# Altium PCB EEM_FMC_Carrier.PcbDoc (part 6 of 19)
Units mm, origin at the board's own origin, x right, y up, seen from the top; angles counter-clockwise.
Board outline 222.9 x 100 mm, 6 copper layers (TopLayer, MidLayer1, MidLayer2, SignalLayer1, Internal Plane 1, BottomLayer), stack 1.528 mm thick; 790 components, 743 nets, 3570 pads, 2277 vias.
Unrouted connection lines stored in the file: 3.
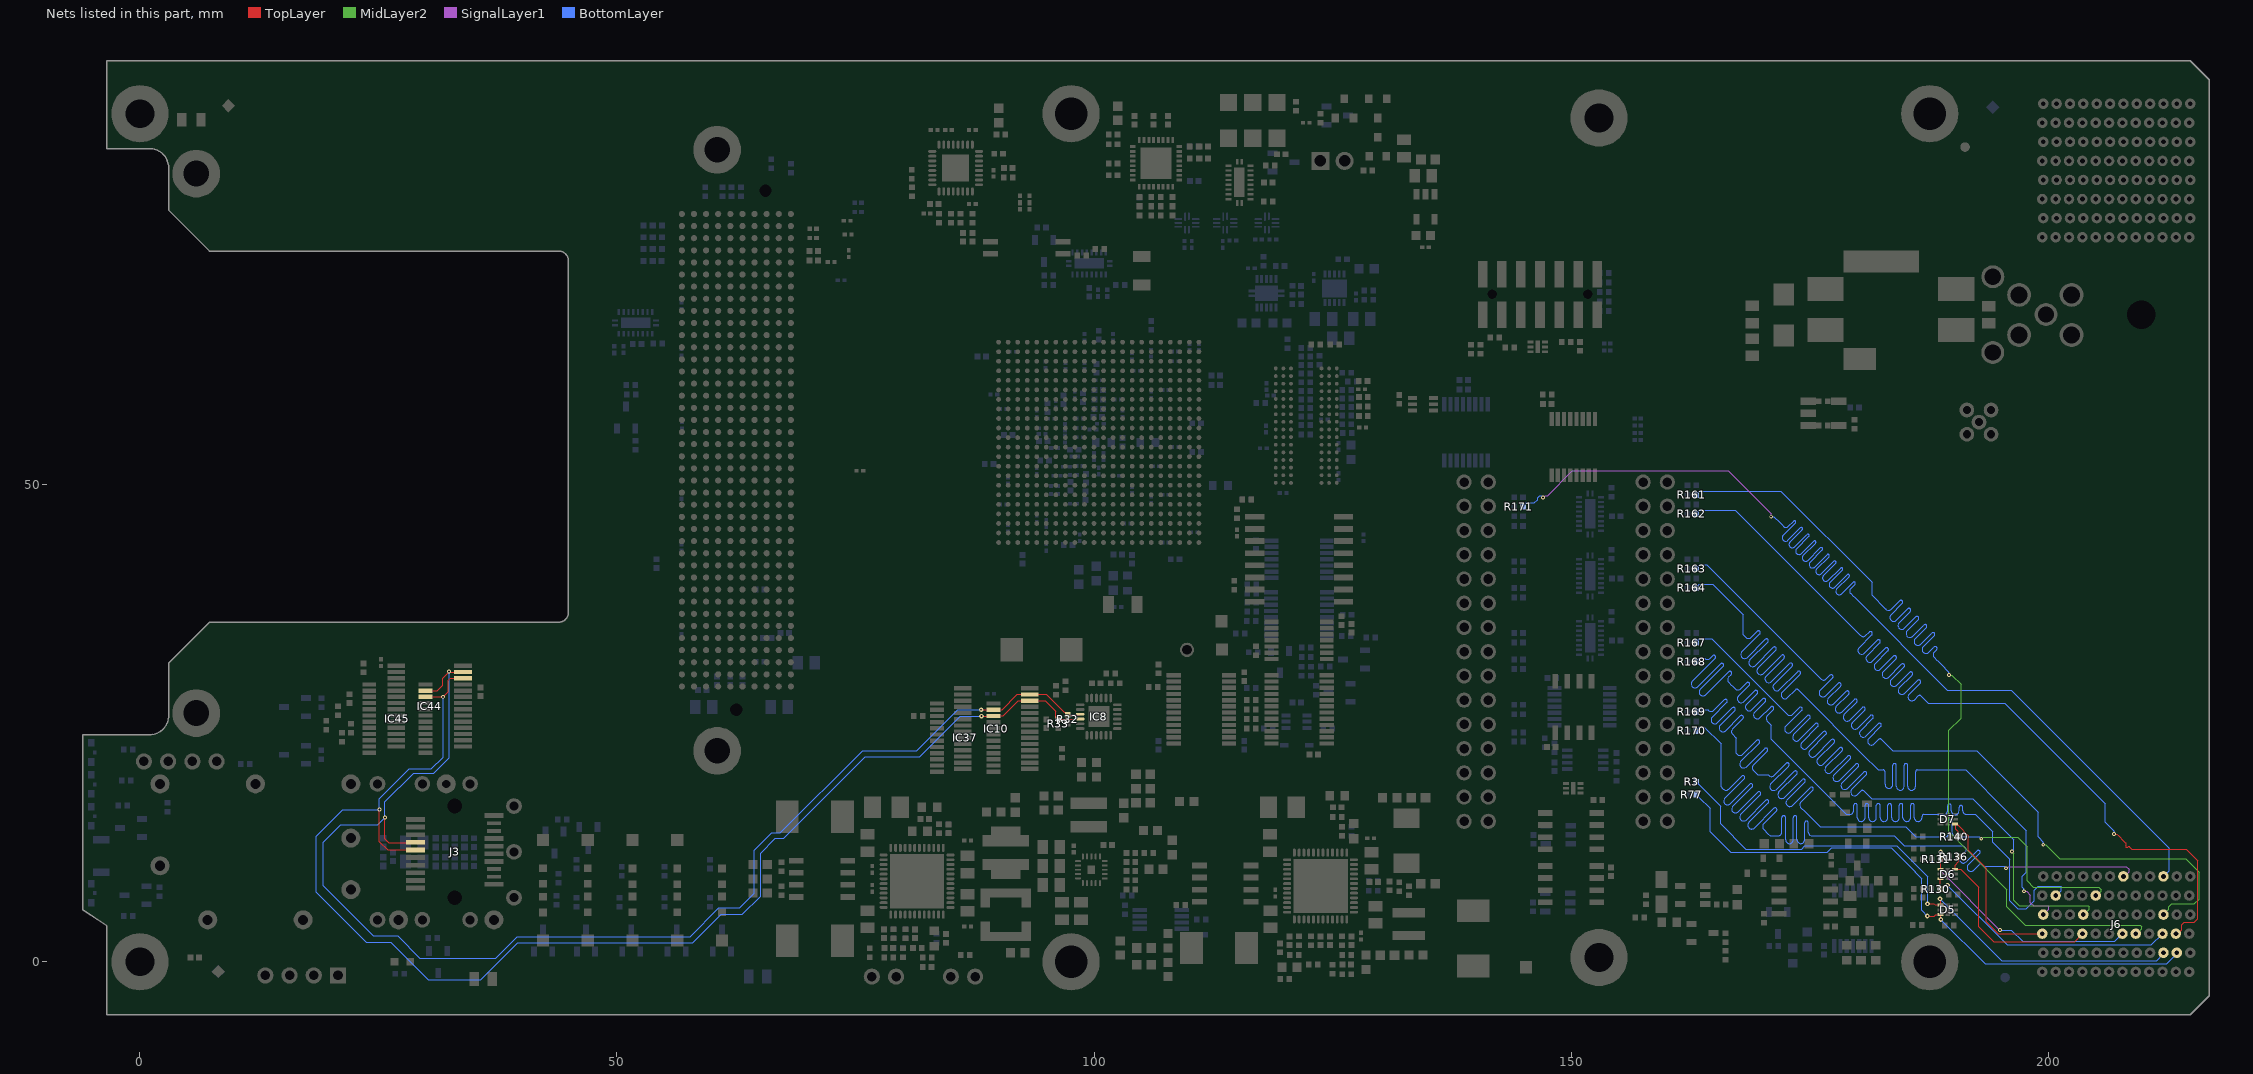
[diagram p8: the nets of this part, all layers, seen from the top]

## Part data (continued)
R66 R189 R201 R203 R210 R214 R219 R290: library part R0402_5K1_1%_0.0625W_100PPM, "Resistor - 1%", Case=0402, Manufacturer=GENERIC, Manufacturer1 ComponentHeight=0.4mm, Manufacturer1 Example="YAGEO PHYCOMP", Manufacturer1 Part Number=232270675102L, Power=0.0625W, Tolerance=±1%, Author="CERN DEM JLC", Component Type=Standard, HelpURL=\\cern.ch\dfs\Applications\Altium\Datasheets\R0402_Phycomp_RC0402.pdf, Manufacturer Part Number=R0402_5K1_1%_0.0625W_100PPM, Mounted=Yes, Part Description="General Purpose Thick Film Chip Resistor", Part Number=R0402_5K1_1%_0.0625W_100PPM, Pin Count=2, PressFit=No, Sense=No, SMD=Yes, Socket=No, Status="Not Recommended", TC=±100ppm/°C
  R66 R189 R201 R210 R290: CreateDate=03.12.2007, LatestRevisionDate=17.10.2012
  R203 R214 R219: CreateDate=2007-12-03, LatestRevisionDate=2012-10-17
R78: library part R0402_300R_1%_0.0625W_100PPM, "Resistor - 1%", Case=0402, Manufacturer=GENERIC, Manufacturer1 ComponentHeight=0.4mm, Manufacturer1 Example="YAGEO PHYCOMP", Manufacturer1 Part Number=232270673001L, Power=0.0625W, Tolerance=±1%, Author="CERN DEM JLC", Component Type=Standard, CreateDate=03.12.2007, HelpURL=\\cern.ch\dfs\Applications\Altium\Datasheets\R0402_Phycomp_RC0402.pdf, LatestRevisionDate=17.10.2012, Manufacturer Part Number=R0402_300R_1%_0.0625W_100PPM, Mounted=Yes, Part Description="General Purpose Thick Film Chip Resistor", Part Number=R0402_300R_1%_0.0625W_100PPM, Pin Count=2, PressFit=No, Sense=No, SMD=Yes, Socket=No, Status="Not Recommended", TC=±100ppm/°C
R88 R89 R90 R91 R130 R131 R132 R133 R134 R135 R136 R137 R138 R139 R140 R274: library part R0402_22R_1%_0.0625W_100PPM, "Resistor - 1%", Case=0402, Manufacturer=GENERIC, Manufacturer1 ComponentHeight=0.4mm, Manufacturer1 Example="YAGEO PHYCOMP", Manufacturer1 Part Number=232270672209L, Power=0.0625W, Tolerance=±1%, Author="CERN DEM JLC", Component Type=Standard, HelpURL=\\cern.ch\dfs\Applications\Altium\Datasheets\R0402_Phycomp_RC0402.pdf, Manufacturer Part Number=R0402_22R_1%_0.0625W_100PPM, Mounted=Yes, Part Description="General Purpose Thick Film Chip Resistor", Part Number=R0402_22R_1%_0.0625W_100PPM, Pin Count=2, PressFit=No, Sense=No, SMD=Yes, Socket=No, Status="Not Recommended"
  R88 R89 R90 R91: CreateDate=03-Dec-07, LatestRevisionDate=17-Oct-12, TC=±100ppm/°C
  R130 R131 R132 R133 R134 R135 R136 R137 R138 R139 R140: CreateDate=03.12.2007, LatestRevisionDate=17.10.2012
  R274: CreateDate=03.12.2007, LatestRevisionDate=17.10.2012, TC=±100ppm/°C
R101: library part R0402_200K_1%_0.0625W_100PPM, "Resistor - 1%", Case=0402, Manufacturer=GENERIC, Manufacturer1 ComponentHeight=0.4mm, Manufacturer1 Example="YAGEO PHYCOMP", Manufacturer1 Part Number=232270672004L, Power=0.0625W, Tolerance=±1%, Author="CERN DEM JLC", Component Type=Standard, CreateDate=03.12.2007, HelpURL=\\cern.ch\dfs\Applications\Altium\Datasheets\R0402_Phycomp_RC0402.pdf, LatestRevisionDate=17.10.2012, Manufacturer Part Number=R0402_200K_1%_0.0625W_100PPM, Mounted=Yes, Part Description="General Purpose Thick Film Chip Resistor", Part Number=R0402_200K_1%_0.0625W_100PPM, Pin Count=2, PressFit=No, Sense=No, SMD=Yes, Socket=No, Status="Not Recommended", TC=±100ppm/°C
R119 R120: library part "R0805_10M_1%_0.125W_100PPM_VISHAY_CRCW e3", "Resistor - 1%", Case=0805, Manufacturer="VISHAY DALE", Manufacturer Part Number=CRCW080510M0FKEA, Power=0.125W, Tolerance=±1%, Author="CERN DEM BC", Component Type=Standard, ComponentHeight=0.5mm, CreateDate=2019-11-12, HelpURL="\\cern.ch\dfs\Applications\Altium\Datasheets\R0805_VISHAY_CRCW e3.pdf", LatestRevisionDate=2019-11-12, Mounted=Yes, Part Description="150V, Standard Thick Film Chip Resistor", Part Number="R0805_10M_1%_0.125W_100PPM_VISHAY_CRCW e3", Pin Count=2, PressFit=No, Sense=No, SMD=Yes, Socket=No, Status=None, TC=±100ppm/°C
R124 R242 R269: library part R0402_100K_1%_0.0625W_100PPM, "Resistor - 1%", Case=0402, Manufacturer=GENERIC, Manufacturer1 ComponentHeight=0.4mm, Manufacturer1 Example="YAGEO PHYCOMP", Manufacturer1 Part Number=232270671004L, Power=0.0625W, Tolerance=±1%, Author="CERN DEM JLC", Component Type=Standard, HelpURL=\\cern.ch\dfs\Applications\Altium\Datasheets\R0402_Phycomp_RC0402.pdf, Manufacturer Part Number=R0402_100K_1%_0.0625W_100PPM, Mounted=Yes, Part Description="General Purpose Thick Film Chip Resistor", Part Number=R0402_100K_1%_0.0625W_100PPM, Pin Count=2, PressFit=No, Sense=No, SMD=Yes, Socket=No, Status="Not Recommended", TC=±100ppm/°C
  R124 R269: CreateDate=03.12.2007, LatestRevisionDate=17.10.2012
  R242: CreateDate=2007-12-03, LatestRevisionDate=2012-10-17
R125 R197 R199 R257 R260 R262 R267 R268 R277 R279 R280 R281 R282: library part R0603_10K_1%_0.1W_100PPM, "Resistor - 1%", Case=0603, Manufacturer=GENERIC, Manufacturer1 ComponentHeight=0.55mm, Manufacturer1 Example="NIC COMPONENT", Manufacturer1 Part Number=NRC06F1002TRF, Power=0.1W, Tolerance=±1%, Author="CERN DEM JLC", Component Type=Standard, CreateDate=03.12.2007, HelpURL=\\cern.ch\dfs\Applications\Altium\Datasheets\R0603_NIC_NRC.pdf, LatestRevisionDate=13.03.2008, Manufacturer Part Number=R0603_10K_1%_0.1W_100PPM, Mounted=Yes, Part Description="General Purpose Thick Film Chip Resistor", Part Number=R0603_10K_1%_0.1W_100PPM, Pin Count=2, PressFit=No, Sense=No, SMD=Yes, Socket=No, Status=Preferred, TC=±100ppm/°C
R126: library part R0805_1M1_1%_0.125W_100PPM, "Resistor - 1%", Case=0805, Manufacturer=GENERIC, Manufacturer1 ComponentHeight=0.6mm, Manufacturer1 Example="NIC COMPONENT", Manufacturer1 Part Number=NRC10F1104TRF, Author="CERN DEM JLC", Component Type=Standard, CreateDate=03/12/2007, HelpURL=\\cern.ch\dfs\Applications\Altium\Datasheets\R0805_NIC_NRC.pdf, LatestRevisionDate=13/03/2008, Manufacturer Part Number=R0805_1M1_1%_0.125W_100PPM, Mounted=Yes, Part Description="General Purpose Thick Film Chip Resistor", Part Number=R0805_1M1_1%_0.125W_100PPM, Pin Count=2, PressFit=No, Sense=No, SMD=Yes, Socket=No, Status=Preferred
R184 R206 R208 R230 R259: library part R0402_7K5_1%_0.0625W_100PPM, "Resistor - 1%", Case=0402, Manufacturer=GENERIC, Manufacturer1 ComponentHeight=0.4mm, Manufacturer1 Example="YAGEO PHYCOMP", Manufacturer1 Part Number=232270677502L, Power=0.0625W, Tolerance=±1%, Author="CERN DEM JLC", Component Type=Standard, CreateDate=03.12.2007, HelpURL=\\cern.ch\dfs\Applications\Altium\Datasheets\R0402_Phycomp_RC0402.pdf, LatestRevisionDate=17.10.2012, Manufacturer Part Number=R0402_7K5_1%_0.0625W_100PPM, Mounted=Yes, Part Description="General Purpose Thick Film Chip Resistor", Part Number=R0402_7K5_1%_0.0625W_100PPM, Pin Count=2, PressFit=No, Sense=No, SMD=Yes, Socket=No, Status="Not Recommended", TC=±100ppm/°C
R185 R205 R209 R232: library part R0402_2K4_1%_0.0625W_100PPM, "Resistor - 1%", Case=0402, Manufacturer=GENERIC, Manufacturer1 ComponentHeight=0.4mm, Manufacturer1 Example="YAGEO PHYCOMP", Manufacturer1 Part Number=232270672402L, Power=0.0625W, Tolerance=±1%, Author="CERN DEM JLC", Component Type=Standard, HelpURL=\\cern.ch\dfs\Applications\Altium\Datasheets\R0402_Phycomp_RC0402.pdf, Manufacturer Part Number=R0402_2K4_1%_0.0625W_100PPM, Mounted=Yes, Part Description="General Purpose Thick Film Chip Resistor", Part Number=R0402_2K4_1%_0.0625W_100PPM, Pin Count=2, PressFit=No, Sense=No, SMD=Yes, Socket=No, Status="Not Recommended", TC=±100ppm/°C
  R185 R209 R232: CreateDate=03.12.2007, LatestRevisionDate=17.10.2012
  R205: CreateDate=2007-12-03, LatestRevisionDate=2012-10-17
R186 R200 R228: library part R0402_1K6_1%_0.0625W_100PPM, "Resistor - 1%", Case=0402, Manufacturer=GENERIC, Manufacturer1 ComponentHeight=0.4mm, Manufacturer1 Example="YAGEO PHYCOMP", Manufacturer1 Part Number=232270671602L, Power=0.0625W, Tolerance=±1%, Author="CERN DEM JLC", Component Type=Standard, HelpURL=\\cern.ch\dfs\Applications\Altium\Datasheets\R0402_Phycomp_RC0402.pdf, Manufacturer Part Number=R0402_1K6_1%_0.0625W_100PPM, Mounted=Yes, Part Description="General Purpose Thick Film Chip Resistor", Part Number=R0402_1K6_1%_0.0625W_100PPM, Pin Count=2, PressFit=No, Sense=No, SMD=Yes, Socket=No, Status="Not Recommended", TC=±100ppm/°C
  R186: CreateDate=03.12.2007, LatestRevisionDate=17.10.2012
  R200 R228: CreateDate=2007-12-03, LatestRevisionDate=2012-10-17
R190 R202: library part R0402_910R_1%_0.0625W_100PPM, "Resistor - 1%", Case=0402, Manufacturer=GENERIC, Manufacturer1 ComponentHeight=0.4mm, Manufacturer1 Example="YAGEO PHYCOMP", Manufacturer1 Part Number=232270679101L, Power=0.0625W, Tolerance=±1%, Author="CERN DEM JLC", Component Type=Standard, CreateDate=03.12.2007, HelpURL=\\cern.ch\dfs\Applications\Altium\Datasheets\R0402_Phycomp_RC0402.pdf, LatestRevisionDate=17.10.2012, Manufacturer Part Number=R0402_910R_1%_0.0625W_100PPM, Mounted=Yes, Part Description="General Purpose Thick Film Chip Resistor", Part Number=R0402_910R_1%_0.0625W_100PPM, Pin Count=2, PressFit=No, Sense=No, SMD=Yes, Socket=No, Status="Not Recommended", TC=±100ppm/°C
R192 R222 R223: library part R0402_22K_1%_0.0625W_100PPM, "Resistor - 1%", Case=0402, Manufacturer=GENERIC, Manufacturer1 ComponentHeight=0.4mm, Manufacturer1 Example="YAGEO PHYCOMP", Manufacturer1 Part Number=232270672203L, Power=0.0625W, Tolerance=±1%, Author="CERN DEM JLC", Component Type=Standard, CreateDate=03.12.2007, HelpURL=\\cern.ch\dfs\Applications\Altium\Datasheets\R0402_Phycomp_RC0402.pdf, LatestRevisionDate=17.10.2012, Manufacturer Part Number=R0402_22K_1%_0.0625W_100PPM, Mounted=Yes, Part Description="General Purpose Thick Film Chip Resistor", Part Number=R0402_22K_1%_0.0625W_100PPM, Pin Count=2, PressFit=No, Sense=No, SMD=Yes, Socket=No, Status="Not Recommended", TC=±100ppm/°C
R198: library part R0402_30K_1%_0.0625W_100PPM, "Resistor - 1%", Case=0402, Manufacturer=GENERIC, Manufacturer1 ComponentHeight=0.4mm, Manufacturer1 Example="YAGEO PHYCOMP", Manufacturer1 Part Number=232270673003L, Power=0.0625W, Tolerance=±1%, Author="CERN DEM JLC", Component Type=Standard, CreateDate=03.12.2007, HelpURL=\\cern.ch\dfs\Applications\Altium\Datasheets\R0402_Phycomp_RC0402.pdf, LatestRevisionDate=17.10.2012, Manufacturer Part Number=R0402_30K_1%_0.0625W_100PPM, Mounted=Yes, Part Description="General Purpose Thick Film Chip Resistor", Part Number=R0402_30K_1%_0.0625W_100PPM, Pin Count=2, PressFit=No, Sense=No, SMD=Yes, Socket=No, Status="Not Recommended", TC=±100ppm/°C
R204 R231: library part R0402_2K_1%_0.0625W_100PPM, "Resistor - 1%", Case=0402, Manufacturer=GENERIC, Manufacturer1 ComponentHeight=0.4mm, Manufacturer1 Example="YAGEO PHYCOMP", Manufacturer1 Part Number=232270672002L, Power=0.0625W, Tolerance=±1%, Author="CERN DEM JLC", Component Type=Standard, CreateDate=2007-12-03, HelpURL=\\cern.ch\dfs\Applications\Altium\Datasheets\R0402_Phycomp_RC0402.pdf, LatestRevisionDate=2012-10-17, Manufacturer Part Number=R0402_2K_1%_0.0625W_100PPM, Mounted=Yes, Part Description="General Purpose Thick Film Chip Resistor", Part Number=R0402_2K_1%_0.0625W_100PPM, Pin Count=2, PressFit=No, Sense=No, SMD=Yes, Socket=No, Status="Not Recommended", TC=±100ppm/°C
R211 R229 R261 R265: library part R0603_2K7_1%_0.1W_100PPM, "Resistor - 1%", Case=0603, Manufacturer=GENERIC, Manufacturer1 ComponentHeight=0.55mm, Manufacturer1 Example="YAGEO PHYCOMP", Manufacturer1 Part Number=RC0603FR-072K7L, Power=0.1W, Tolerance=±1%, Author="CERN DEM JLC", Component Type=Standard, HelpURL=\\cern.ch\dfs\Applications\Altium\Datasheets\R0603_PHYCOMP_RC0603.pdf, Manufacturer Part Number=R0603_2K7_1%_0.1W_100PPM, Mounted=Yes, Part Description="General Purpose Thick Film Chip Resistor", Part Number=R0603_2K7_1%_0.1W_100PPM, Pin Count=2, PressFit=No, Sense=No, SMD=Yes, Socket=No, Status=Preferred, TC=±100ppm/°C
  R211 R261 R265: CreateDate=02.05.2011, LatestRevisionDate=02.05.2011
  R229: CreateDate=2011-05-02, LatestRevisionDate=2011-05-02
R212 R241: library part "43k2 1% 0402", "Resistor - 1%", Case=0402, Manufacturer="MULTICOMP PRO", Manufacturer Part Number=MCMR04X4322FTL, Power=0.063W, Tolerance=±1%
R216 R220: library part R0402_3K6_1%_0.0625W_100PPM, "Resistor - 1%", Case=0402, Manufacturer=GENERIC, Manufacturer1 ComponentHeight=0.4mm, Manufacturer1 Example="YAGEO PHYCOMP", Manufacturer1 Part Number=232270673602L, Power=0.0625W, Tolerance=±1%, Author="CERN DEM JLC", Component Type=Standard, CreateDate=2007-12-03, HelpURL=\\cern.ch\dfs\Applications\Altium\Datasheets\R0402_Phycomp_RC0402.pdf, LatestRevisionDate=2012-10-17, Manufacturer Part Number=R0402_3K6_1%_0.0625W_100PPM, Mounted=Yes, Part Description="General Purpose Thick Film Chip Resistor", Part Number=R0402_3K6_1%_0.0625W_100PPM, Pin Count=2, PressFit=No, Sense=No, SMD=Yes, Socket=No, Status="Not Recommended", TC=±100ppm/°C
R217: library part R0402_75K_1%_0.0625W_100PPM, "Resistor - 1%", Case=0402, Manufacturer=GENERIC, Manufacturer1 ComponentHeight=0.4mm, Manufacturer1 Example="YAGEO PHYCOMP", Manufacturer1 Part Number=232270677503L, Power=0.0625W, Tolerance=±1%, Author="CERN DEM JLC", Component Type=Standard, CreateDate=2007-12-03, HelpURL=\\cern.ch\dfs\Applications\Altium\Datasheets\R0402_Phycomp_RC0402.pdf, LatestRevisionDate=2012-10-17, Manufacturer Part Number=R0402_75K_1%_0.0625W_100PPM, Mounted=Yes, Part Description="General Purpose Thick Film Chip Resistor", Part Number=R0402_75K_1%_0.0625W_100PPM, Pin Count=2, PressFit=No, Sense=No, SMD=Yes, Socket=No, Status="Not Recommended", TC=±100ppm/°C
R218 R258: library part R0402_9K1_1%_0.0625W_100PPM, "Resistor - 1%", Case=0402, Manufacturer=GENERIC, Manufacturer1 ComponentHeight=0.4mm, Manufacturer1 Example="YAGEO PHYCOMP", Manufacturer1 Part Number=232270679102L, Power=0.0625W, Tolerance=±1%, Author="CERN DEM JLC", Component Type=Standard, CreateDate=2007-12-03, HelpURL=\\cern.ch\dfs\Applications\Altium\Datasheets\R0402_Phycomp_RC0402.pdf, LatestRevisionDate=2012-10-17, Manufacturer Part Number=R0402_9K1_1%_0.0625W_100PPM, Mounted=Yes, Part Description="General Purpose Thick Film Chip Resistor", Part Number=R0402_9K1_1%_0.0625W_100PPM, Pin Count=2, PressFit=No, Sense=No, SMD=Yes, Socket=No, Status="Not Recommended", TC=±100ppm/°C
R234: library part R0402_3K_1%_0.0625W_100PPM, "Resistor - 1%", Case=0402, Manufacturer=GENERIC, Manufacturer1 ComponentHeight=0.4mm, Manufacturer1 Example="YAGEO PHYCOMP", Manufacturer1 Part Number=232270673002L, Power=0.0625W, Tolerance=±1%, Author="CERN DEM JLC", Component Type=Standard, CreateDate=2007-12-03, HelpURL=\\cern.ch\dfs\Applications\Altium\Datasheets\R0402_Phycomp_RC0402.pdf, LatestRevisionDate=2012-10-17, Manufacturer Part Number=R0402_3K_1%_0.0625W_100PPM, Mounted=Yes, Part Description="General Purpose Thick Film Chip Resistor", Part Number=R0402_3K_1%_0.0625W_100PPM, Pin Count=2, PressFit=No, Sense=No, SMD=Yes, Socket=No, Status="Not Recommended", TC=±100ppm/°C
R239: library part R0603_35K7_0.1%_0.063W_10PPM, "Resistor - 0.1%", Case=0603, Manufacturer=GENERIC, Manufacturer1 ComponentHeight=0.5mm, Manufacturer1 Example="TYCO HOLSWORTHY", Manufacturer1 Part Number=RN73C1J35K7BTDF, Power=0.063W, Tolerance=±0.1%, Author="CERN DEM JLC", Component Type=Standard, CreateDate=2007-12-03, HelpURL=\\cern.ch\dfs\Applications\Altium\Datasheets\R0603_Tyco_RN73.pdf, LatestRevisionDate=2008-03-13, Manufacturer Part Number=R0603_35K7_0.1%_0.063W_10PPM, Mounted=Yes, Part Description="Thin Film Chip Resistor", Part Number=R0603_35K7_0.1%_0.063W_10PPM, Pin Count=2, PressFit=No, Sense=No, SMD=Yes, Socket=No, Status="Not Recommended", TC=±10ppm
R240: library part R0603_28K7_0.1%_0.063W_10PPM, "Resistor - 0.1%", Case=0603, Manufacturer=GENERIC, Manufacturer1 ComponentHeight=0.5mm, Manufacturer1 Example="TYCO HOLSWORTHY", Manufacturer1 Part Number=RN73C1J28K7BTDF, Power=0.063W, Tolerance=±0.1%, Author="CERN DEM JLC", Component Type=Standard, CreateDate=2007-12-03, HelpURL=\\cern.ch\dfs\Applications\Altium\Datasheets\R0603_Tyco_RN73.pdf, LatestRevisionDate=2008-03-13, Manufacturer Part Number=R0603_28K7_0.1%_0.063W_10PPM, Mounted=Yes, Part Description="Thin Film Chip Resistor", Part Number=R0603_28K7_0.1%_0.063W_10PPM, Pin Count=2, PressFit=No, Sense=No, SMD=Yes, Socket=No, Status="Not Recommended", TC=±10ppm
R243 R244: library part R0402_300K_1%_0.0625W_100PPM, "Resistor - 1%", Case=0402, Manufacturer=GENERIC, Manufacturer1 ComponentHeight=0.4mm, Manufacturer1 Example="YAGEO PHYCOMP", Manufacturer1 Part Number=232270673004L, Power=0.0625W, Tolerance=±1%, Author="CERN DEM JLC", Component Type=Standard, CreateDate=2007-12-03, HelpURL=\\cern.ch\dfs\Applications\Altium\Datasheets\R0402_Phycomp_RC0402.pdf, LatestRevisionDate=2012-10-17, Manufacturer Part Number=R0402_300K_1%_0.0625W_100PPM, Mounted=Yes, Part Description="General Purpose Thick Film Chip Resistor", Part Number=R0402_300K_1%_0.0625W_100PPM, Pin Count=2, PressFit=No, Sense=No, SMD=Yes, Socket=No, Status="Not Recommended", TC=±100ppm/°C
R289: library part R0402_330K_1%_0.0625W_100PPM, "Resistor - 1%", Case=0402, Manufacturer=GENERIC, Manufacturer1 ComponentHeight=0.4mm, Manufacturer1 Example="YAGEO PHYCOMP", Manufacturer1 Part Number=232270673304L, Power=0.0625W, Tolerance=±1%, Author="CERN DEM JLC", Component Type=Standard, CreateDate=03.12.2007, HelpURL=\\cern.ch\dfs\Applications\Altium\Datasheets\R0402_Phycomp_RC0402.pdf, LatestRevisionDate=17.10.2012, Manufacturer Part Number=R0402_330K_1%_0.0625W_100PPM, Mounted=Yes, Part Description="General Purpose Thick Film Chip Resistor", Part Number=R0402_330K_1%_0.0625W_100PPM, Pin Count=2, PressFit=No, Sense=No, SMD=Yes, Socket=No, Status="Not Recommended", TC=±100ppm/°C
SW1: library part SW_TYCO_1571983-1, "2 Ways SPST DIP Switch", Manufacturer=TYCO, Manufacturer Part Number="1571983-1 or GDH02S04", Author="CERN DEM JLC", Component Type=Standard, ComponentHeight=2.31mm, CreateDate=08.01.2009, Family=Switch, HelpURL=\\cern.ch\dfs\Applications\Altium\Datasheets\SW_TYCO_1571983-1.pdf, LatestRevisionDate=08.01.2009, Mounted=Yes, PackageDescription="Pitch 1.27mm,  Body3.66x6.2mm, 2 Ways SPST Surface-Mount DIP Switch, TYCO GDH Series", Part Description="2 Way SPST SMD DIP Switch, Latched, Contact Rating 0.025A 24VDC", Part Number=SW_TYCO_1571983-1, Pin Count=4, PressFit=No, Sense=No, SMD=Yes, Socket=No, Status=None
SW2: library part SW_OMRON_B3U-3000PM, "1 Ways SPST DIP Switch", Manufacturer=OMRON, Manufacturer Part Number=B3U-3000PM, Author="CERN DEM HF", Component Type=Standard, ComponentHeight=1.35mm, CreateDate=2022-10-04, Family=Switch, HelpURL=\\cern.ch\dfs\Applications\Altium\Datasheets\SW_OMRON_B3U.pdf, LatestRevisionDate=2022-10-04, Mounted=Yes, PackageDescription="Body 3.2x4.0mm, SPST Surface-Mounting Tactile Switch with Side Actuator (B3U Series)", Part Description="Ultra-small Surface-mounting Tactile Switche with High Contact Reliability, Side-actuated, Contact Rating 50mA 12VDC", Part Number=SW_OMRON_B3U-3000PM, Pin Count=2, PressFit=No, Sense=Yes, Sense Comment=Non-washable, SMD=Yes, Socket=No, Status=None
T1: library part CMP-013-00664-1, "Trans MOSFET P-CH 50V 0.18A Automotive 3-Pin SOT-23 T/R", Case/Package=TO-236-3, Max Operating Temperature=150°C, Min Operating Temperature=-55°C, Mounting Technology="Surface Mount"
T2 T3 T4 T5 T6 T8 T10 T11 T12 T13 T14 T16 T17 T18 T19 T20 T21 T22 T23: library part IRFML8244TRPBF, "N-CHANNEL MOSFET WITH DIODE", Case=SOT23-3, Manufacturer="INTERNATIONAL RECTIFIER", Manufacturer Part Number=IRFML8244TR, Author="CERN DEM JMW", Bonding=No, Component Type=Standard, ComponentHeight=1.12mm, CreateDate=07.08.2015, Device=IRFML8244TRPbF, HelpURL=\\cern.ch\dfs\Applications\Altium\Datasheets\IRFML8244TRPbF.pdf, LatestRevisionDate=02.06.2022, Mounted=Yes, PackageDescription="SOT23, 0.95mm Pitch; 3 Pin, 1.30mm W X 2.92mm L X 1.12mm H body, IPC Medium Density", Part Description="25V 5.8A N-Channel HEXFET® Power MOSFET", Part Number=IRFML8244TRPBF, Pin Count=3, PressFit=No, Sense=No, SMD=Yes, Socket=No
T7 T9: "20V DUAL N-Channel 2.5V Specified PowerTrench MOSFET", Case=SOIC8, Manufacturer="FAIRCHILD SEMICONDUCTOR", Author="CERN DEM BC", Bonding=No, Component Type=Standard, ComponentHeight=1.75mm, CreateDate=2015-09-02, Device=FDS9926A, HelpURL=\\cern.ch\dfs\Applications\Altium\Datasheets\FDS9926A.pdf, LatestRevisionDate=2015-09-02, Manufacturer Part Number=FDS9926A, Mounted=Yes, PackageDescription="SOIC 8, Pitch 1.27mm - Body 4x5mm, IPC Medium Density", Part Description="20V DUAL N-Channel 2.5V Specified PowerTrench® MOSFET", Part Number=FDS9926A, Pin Count=8, PressFit=No, Sense=No, SMD=Yes, Socket=No
T15 T24 T25 T26: "N-CHANNEL MOSFET WITH DIODE", Case=SOT23-3, Manufacturer="ON SEMICONDUCTOR", Manufacturer Part Number=BSS138L, Author="CERN DEM JLC", Bonding=No, Component Type=Standard, ComponentHeight=1.11mm, CreateDate=23.03.2009, Device=BSS138LT1G, HelpURL=\\cern.ch\dfs\Applications\Altium\Datasheets\BSS138LT1G.pdf, LatestRevisionDate=25.05.2022, Mounted=Yes, PackageDescription="SOT23, 0.95mm Pitch; 3 Pin, 1.40mm W X 3.00mm L X 1.10mm H body, IPC Medium Density", Part Description="50V, 200mA N-Channel Enhancement Mode Field-Effect Transistor", Part Number=BSS138LT1G, Pin Count=3, PressFit=No, Sense=No, SMD=Yes, Socket=No
TP1 TP2 TP3 TP4 TP5 TP6 TP7 TP8 TP9 TP10: library part SMD_PAD_1.27X1.27MM, "Test Point", Author="CERN DEM JLC", Component Type="Standard (No BOM)", ComponentHeight=0mm, CreateDate=12.01.2008, Family="Test Point", HelpURL=Undefined, LatestRevisionDate=12.01.2008, Mounted=No, PackageDescription="1.27mm x 1.27mm PCB Copper Area (SMD Test Point)", Part Description="1.27mm x 1.27mm PCB Copper Area (SMD Test Point)", Part Number=SMD_PAD_1.27X1.27MM, Pin Count=1, Sense=No, SMD=Yes, Socket=No, Status=None
TR1: library part XFMR_MINI-CIRCUITS_TC2-72T+, "50 Ohms 10 to 700 MHzz RF Transformer", Manufacturer=MINI-CIRCUITS, Manufacturer Part Number=TC2-72T+, Author=GK, Component Type=Standard, ComponentHeight=4.06mm, CreateDate=18.10.2019, HelpURL=\\cern.ch\dfs\Applications\Altium\Datasheets\XFMR_MINI-CIRCUITS_TC2-1TX+.pdf, LatestRevisionDate=18.10.2019, Mounted=Yes, Part Description="50 Ohms 10 to 700MHz RF Transformer", Part Number=XFMR_MINI-CIRCUITS_TC2-72T+, Pin Count=5, Sense=No, SMD=Yes, Socket=No, Status=None
W1 W2: library part SAMTEC_MTLW-102-07-L-S-250, "2 Mini Wire-Wrap Contact Strip Header", Manufacturer=SAMTEC, Manufacturer Part Number=MTLW-102-07-L-S-250, Author="CERN DEM JLC", Component Type=Standard, ComponentHeight=7.87mm, CreateDate=2012-12-13, Family="Header 2", HelpURL=\\cern.ch\dfs\Applications\Altium\Datasheets\SAMTEC_MTLW-102-07-L-S-250.pdf, LatestRevisionDate=2012-12-13, Mounted=Yes, Part Description="2 Contacts, Pitch 2.54mm, Single Row Through Mount Straight Header (Post Lead = 6.35mm, Tail Lead 3.05mm, Insulator 1.52mm)", Part Number=SAMTEC_MTLW-102-07-L-S-250, Pin Count=2, PressFit=No, Sense=No, SMD=No, Socket=No, Status=None
W3: library part SAMTEC_HTSW-104-23-L-S, "4 Mini Wire-Wrap Contact Strip Header", Manufacturer=SAMTEC, Manufacturer Part Number=HTSW-104-23-L-S, Author="CERN DEM JLC", Component Type=Standard, ComponentHeight=8.38mm, CreateDate=22/02/2018, Family="Header 4", HelpURL=\\cern.ch\dfs\Applications\Altium\Datasheets\SAMTEC_HTSW-104-23-L-S.pdf, LatestRevisionDate=22/02/2018, Mounted=Yes, Part Description="4 Contacts, Pitch 2.54mm, Single Row  Through Mount Straight Header (Post Lead 5.84mm, Tail Lead 2.92mm, Insulator 2.54mm)", Part Number=SAMTEC_HTSW-104-23-L-S, Pin Count=4, PressFit=No, Sense=No, SMD=No, Socket=No, Status=Preferred, Status Comment="High Temperature"

## Via types
v1: diameter 0.4, hole 0.2, TopLayer to BottomLayer, tented both sides, 1032 vias
v2: diameter 0.5, hole 0.2, TopLayer to BottomLayer, tented both sides, 979 vias
v3: diameter 0.5, hole 0.2, TopLayer to BottomLayer, 162 vias
v4: diameter 0.8, hole 0.5, TopLayer to BottomLayer, tented both sides, 102 vias
v5: diameter 0.6, hole 0.3, TopLayer to BottomLayer, tented both sides, 2 vias

## Nets (pads, with @x,y where several pads share a name; then routed paths per layer and width w, separated by ;. In a path a pad name is that pad's centre, name@x,y a point inside that pad or via, vN(x,y) a via of type N, cw(c..) or ccw(c..) an arc to the next point about the centre after c; other vN are vias at no path point)
BGA0: D6.3 J6.C3 R130.2 | length 27.6
  TopLayer w0.114: D6.3@188.675,8.637 D6.3@188.738,8.7 188.72,8.682 188.72,8.637 188.72,7.9 R130.2@188.72,7.725 ; R130.2@188.72,7.625 188.72,7.64 188.953,7.873 189.193,7.873 189.346,8.025 v2(189.45,8.025)
  BottomLayer w0.114: v2(189.45,8.025) 195.7,1.775 210.825,1.775 J6.C3@212,2.95
BGA1: D6.1 J6.F3 R131.2 | length 26.3
  TopLayer w0.114: D6.1@188.738,9.7 188.75,9.712 v2(188.75,11.525)
  SignalLayer1 w0.114: v2(188.75,11.525) 188.75,9.525 v1(194.95,3.325)
  BottomLayer w0.114: v1(194.95,3.325) 196.168,3.325 197.35,2.143 206.993,2.143 J6.F3@207.8,2.95
BGA2: D6.6 J6.I3 R136.2 | length 20.8
  TopLayer w0.114: R136.2@190.582,11.03 190.661,10.951 190.661,10.528 190.258,10.125 D6.6@190.258,9.7 190.875,9.7 192.748,7.827 192.748,3.7 194.323,2.125 202.775,2.125 J6.I3@203.6,2.95
BGA3: D7.4 J6.L3 R140.2 | length 19.5
  TopLayer w0.114: D7.4@190.35,14.444 190.429,14.444 190.516,14.357 190.516,14.347 191.625,13.239 191.625,11.7 193.525,9.8 193.525,4.198 194.773,2.95 J6.L3@199.4,2.95 ; D7.4@190.35,14.475 190.35,13.9 190.615,13.635 R140.2@190.615,13.134
Board_I2C.SCL: IC8.4 IC10.12 IC37.22 IC44.12 IC45.22 J3.5 R33.1 | length 142.4
  TopLayer w0.125: IC10.12@93.248,27.375 94.898,27.375 96.001,26.273 96.001,25.647 96.228,25.42 R33.1@96.248,25.42 96.278,25.45 IC8.4@98.548,25.45
  TopLayer w0.127: v1(25.1,15.95) 25.1,12.575 25.95,11.725 J3.5@28.938,11.725 ; IC45.22@29.925,27.775 v1(31.775,27.775) 32.325,28.325 32.325,29.525 32.525,29.725 IC44.12@33.853,29.725 ; v2(88.2,25.75) 89.425,25.75 IC37.22@89.45,25.775 90.475,25.775 92.075,27.375 IC10.12@93.248,27.375
  BottomLayer w0.127: v1(31.775,27.775) 31.775,21.45 30.55,20.225 28.225,20.225 25.1,17.1 v1(25.1,15.95) 21.275,15.95 18.5,13.175 18.5,7.275 23.725,2.05 26.275,2.05 30.225,-1.9 35.7,-1.9 39.575,1.975 57.95,1.975 60.95,4.975 63.13,4.975 65.05,6.895 65.05,11.395 66.605,12.95 67.5,12.95 76.025,21.475 81.725,21.475 86,25.75 v2(88.2,25.75)
Board_I2C.SDA: IC8.3 IC10.13 IC37.23 IC44.13 IC45.23 J3.4 R32.1 | length 139.7
  TopLayer w0.125: v2(88.175,26.425) IC37.23@89.45,26.425 90.375,26.425 91.975,28.025 IC10.13@93.248,28.025 94.975,28.025 96.856,26.144 97.024,26.144 R32.1@97.248,25.92 98.518,25.92 IC8.3@98.548,25.95
  TopLayer w0.127: v1(25.675,15.125) 25.675,12.925 26.1,12.5 28.875,12.5 J3.4@28.9,12.525 ; IC45.23@29.925,28.425 31.175,28.425 31.725,28.975 31.725,29.725 v1@32.375,30.375 ; v1(32.4,30.425) 32.45,30.375 IC44.13@33.853,30.375
  BottomLayer w0.125: v1(25.675,15.125) 24.9,14.35 21.025,14.35 19.225,12.55 19.225,7.95 24.45,2.725 27,2.725 29.35,0.375 37.275,0.375 39.55,2.65 57.67,2.65 60.67,5.65 62.85,5.65 64.375,7.175 64.375,11.675 66.215,13.515 67.11,13.515 75.745,22.15 81.445,22.15 85.72,26.425 v2(88.175,26.425)
  BottomLayer w0.127: v1(25.675,15.125) 25.675,16.775 28.687,19.787 30.813,19.787 32.4,21.375 v1(32.4,30.425)
BP_I2C.SCL: D5.3 J6.B2 R77.1 | length 62.5
  TopLayer w0.114: v2(187.348,4.8) 188.075,4.8 188.225,4.95 188.8,4.95 188.761,4.911 v2(188.761,4.433)
  BottomLayer w0.114: R77.1@163.15,17.526 163.15,17.506 163.383,17.273 163.403,17.273 164.6,16.076 164.6,13.65 166.754,11.496 176.871,11.496 177.325,11.95 183.551,11.95 186.059,9.442 186.059,9.406 186.745,8.72 186.745,5.403 v2(187.348,4.8) ; v2(188.761,4.433) 193.419,-0.225 196.15,-0.225 198.375,-0.225 212.425,-0.225 213.5,0.85 J6.B2@213.5,0.95
BP_I2C.SDA: D5.1 J6.C2 R3.1 | length 61.2
  TopLayer w0.114: v2(187.373,6.075) 187.398,6.1 188.025,6.1 188.168,5.957 D5.1@188.738,5.957 ; v2(188.675,6.6) 188.738,6.537 D5.1@188.738,5.95
  BottomLayer w0.114: R3.1@163.15,18.872 163.15,18.852 163.383,18.619 163.403,18.619 165.7,16.322 165.7,14.448 168.323,11.825 171.601,11.825 174.175,11.825 174.525,12.175 184.125,12.175 187.373,8.927 v2(187.373,6.075) ; v2(188.675,6.6) 195.156,0.119 196.3,0.119 196.65,0.119 211.394,0.119 212.1,0.825 J6.C2@212.1,0.95
BP_IO.LVDS_N0: J6.E3 R161.1 | length 101.1
  MidLayer2 w0.11: v1(189.623,30.075) 189.643,30.055 189.899,30.055 190.882,29.072 190.882,25.518 189.613,24.248 189.613,13.627 195.697,7.543 195.697,5.768 197.615,3.85 209.65,3.85 209.8,3.7 209.8,3.45 209.3,2.95 J6.E3@209.2,2.95
  BottomLayer w0.085: R161.1@163.15,48.95 163.397,49.197 163.397,49.294 163.447,49.344 171.994,49.344 181.563,39.775 181.563,38.409 182.9,37.072 182.963,37.01 182.974,36.998 183.005,36.967 ccw(c183.291,37.253) 183.577,36.967 184.446,37.835 cw(c184.582,37.699) 184.718,37.835 cw(c184.582,37.699) 184.718,37.563 ; 184.717,37.562 183.543,36.388 ccw(c183.829,36.102) 184.08,35.784 184.084,35.784 185.29,36.991 cw(c185.426,36.855) 185.562,36.991 cw(c185.426,36.855) 185.562,36.719 ; 185.562,36.718 184.387,35.543 ccw(c184.673,35.257) 184.924,34.94 184.928,34.94 186.134,36.147 cw(c186.27,36.011) 186.407,36.147 cw(c186.27,36.011) 186.407,35.874 ; 186.406,35.874 185.231,34.699 ccw(c185.517,34.413) 185.768,34.096 185.772,34.096 186.979,35.302 cw(c187.115,35.166) 187.251,35.302 cw(c187.115,35.166) 187.251,35.03 ; 187.25,35.03 186.075,33.855 ccw(c186.361,33.569) 186.613,33.252 186.616,33.252 187.823,34.458 cw(c187.959,34.322) 188.095,34.458 cw(c187.959,34.322) 188.095,34.186 ; 188.095,34.185 186.92,33.01 ccw(c187.206,32.724) 187.457,32.407 187.461,32.407 188.042,32.988 cw(c188.178,32.852) 188.314,32.988 cw(c188.178,32.852) 188.314,32.716 188.071,32.473 ccw(c188.357,32.187) 188.071,31.901 188.354,31.618 188.428,31.544 188.736,31.236 189.62,30.353 189.62,30.078 v1(189.623,30.075)
BP_IO.LVDS_N1: J6.B3 R162.1 | length 109.6
  TopLayer w0.085: v1(206.924,13.401) 206.927,13.397 207.201,13.397 207.356,13.243 ; 207.357,13.243 207.938,12.663 208.169,12.431 cw(c208.068,12.33) 208.169,12.229 208.168,12.228 ccw(c208.269,12.127) 208.168,12.027 ccw(c208.269,12.127) 208.369,12.027 208.371,12.028 cw(c208.471,11.927) 208.572,12.028 208.775,11.825 214.475,11.825 214.8,11.5 215.321,10.979 215.692,10.608 215.692,4.517 215.325,4.15 214.261,4.15 213.994,3.883 213.994,3.375 213.569,2.95 J6.B3@213.4,2.95
  BottomLayer w0.085: R162.1@163.15,46.95 163.391,47.191 163.391,47.294 163.441,47.344 167.206,47.344 180.238,34.313 180.343,34.208 ccw(c180.629,34.494) 180.915,34.208 181.262,34.555 cw(c181.398,34.419) 181.534,34.555 cw(c181.398,34.419) 181.534,34.283 ; 181.534,34.282 180.189,32.937 ccw(c180.475,32.651) 180.726,32.334 180.73,32.334 182.106,33.711 cw(c182.243,33.575) 182.379,33.711 cw(c182.243,33.575) 182.379,33.439 ; 182.378,33.438 181.033,32.093 ccw(c181.319,31.807) 181.57,31.49 181.574,31.49 182.951,32.866 cw(c183.087,32.73) 183.223,32.866 cw(c183.087,32.73) 183.223,32.594 181.877,31.249 ccw(c182.163,30.963) 182.414,30.646 182.418,30.646 183.795,32.022 cw(c183.931,31.886) 184.067,32.022 cw(c183.931,31.886) 184.067,31.75 ; 184.067,31.749 182.722,30.404 ccw(c183.008,30.118) 183.259,29.801 183.263,29.801 184.639,31.178 cw(c184.775,31.042) 184.911,31.178 cw(c184.775,31.042) 184.911,30.906 ; 184.911,30.905 183.566,29.56 ccw(c183.852,29.274) 184.103,28.957 184.107,28.957 185.484,30.334 cw(c185.62,30.198) 185.756,30.334 cw(c185.62,30.198) 185.756,30.061 ; 185.755,30.061 184.41,28.716 ccw(c184.696,28.43) 184.947,28.113 184.951,28.113 186.328,29.489 cw(c186.464,29.353) 186.6,29.489 cw(c186.464,29.353) 186.6,29.217 185.436,28.053 ccw(c185.722,27.767) 186.008,27.481 186.402,27.875 cw(c186.539,27.739) 186.675,27.875 ; 186.675,27.875 187.325,27.225 187.45,27.1 195.463,27.1 205.988,16.575 205.988,14.637 206.943,13.682 206.943,13.42 v1(206.924,13.401)
BP_IO.LVDS_N2: J6.C4 R163.1 | length 105.4
  MidLayer2 w0.11: v1(199.499,12.275) 199.518,12.256 199.775,12.256 201.231,10.8 214.455,10.8 215.85,9.405 215.85,6.578 215.334,6.062 212.962,6.062 212.663,5.763 212.663,5.513 J6.C4@212.1,4.95
  BottomLayer w0.085: R163.1@163.15,41.2 163.397,41.447 163.397,41.544 163.478,41.625 164.225,41.625 176.094,29.756 176.168,29.682 176.199,29.651 ccw(c176.485,29.937) 176.771,29.651 177.144,30.023 cw(c177.28,29.887) 177.416,30.023 cw(c177.28,29.887) 177.416,29.751 ; 177.416,29.75 176.124,28.459 ccw(c176.41,28.173) 176.124,27.887 ccw(c176.41,28.173) 176.661,27.856 176.665,27.856 177.988,29.179 cw(c178.124,29.043) 178.26,29.179 cw(c178.124,29.043) 178.26,28.907 ; 178.26,28.906 176.968,27.614 ccw(c177.254,27.328) 177.505,27.011 177.509,27.011 178.832,28.335 cw(c178.969,28.198) 179.105,28.335 cw(c178.969,28.198) 179.105,28.062 ; 179.104,28.062 177.813,26.77 ccw(c178.099,26.484) 177.813,26.198 ccw(c178.099,26.484) 178.35,26.167 178.354,26.167 179.677,27.49 cw(c179.813,27.354) 179.949,27.49 cw(c179.813,27.354) 179.949,27.218 ; 179.948,27.217 178.657,25.926 ccw(c178.943,25.64) 178.657,25.354 ccw(c178.943,25.64) 179.194,25.323 179.198,25.323 180.521,26.646 cw(c180.657,26.51) 180.793,26.646 cw(c180.657,26.51) 180.793,26.374 179.501,25.082 ccw(c179.787,24.796) 180.038,24.479 180.042,24.479 181.365,25.802 cw(c181.501,25.666) 181.638,25.802 cw(c181.501,25.666) 181.638,25.529 ; 181.637,25.529 180.345,24.237 ccw(c180.631,23.951) 180.345,23.665 ccw(c180.631,23.951) 180.883,23.634 180.886,23.634 182.21,24.957 cw(c182.346,24.821) 182.482,24.957 cw(c182.346,24.821) 182.482,24.685 ; 182.481,24.685 181.203,23.407 ccw(c181.489,23.121) 181.203,22.835 ccw(c181.489,23.121) 181.775,22.835 182.259,23.319 cw(c182.395,23.182) 182.532,23.318 183.218,22.632 183.292,22.558 183.737,22.113 192.537,22.113 197.45,17.2 198.95,15.7 198.95,13.098 199.495,12.553 199.495,12.279 v1(199.499,12.275)
BP_IO.LVDS_N3: J6.L4 R164.1 | length 107.4
  SignalLayer1 w0.11: v1(197.475,7.4) 197.495,7.38 197.751,7.38 198.163,6.969 198.163,6.177 198.481,5.858 199.974,5.858 200.081,5.75 200.081,5.5 199.532,4.95 J6.L4@199.5,4.95
  BottomLayer w0.085: R164.1@163.15,39.2 163.397,39.447 163.397,39.544 163.447,39.594 164.831,39.594 167,37.425 168.05,36.375 168.05,34.275 168.213,34.113 168.318,34.008 ccw(c168.604,34.294) 168.89,34.008 169.521,34.639 cw(c169.658,34.503) 169.794,34.639 cw(c169.658,34.503) 169.794,34.367 ; 169.793,34.367 167.91,32.484 ccw(c168.196,32.198) 168.448,31.881 168.451,31.881 170.366,33.795 cw(c170.502,33.659) 170.638,33.795 cw(c170.502,33.659) 170.638,33.523 ; 170.637,33.522 168.755,31.64 ccw(c169.041,31.354) 169.292,31.036 169.296,31.036 171.21,32.951 cw(c171.346,32.815) 171.482,32.951 cw(c171.346,32.815) 171.482,32.679 ; 171.482,32.678 169.599,30.795 ccw(c169.885,30.509) 170.136,30.192 170.14,30.192 172.054,32.107 cw(c172.19,31.97) 172.327,32.107 cw(c172.19,31.97) 172.327,31.834 ; 172.326,31.834 170.443,29.951 ccw(c170.729,29.665) 170.98,29.348 170.984,29.348 172.899,31.262 cw(c173.035,31.126) 173.171,31.262 cw(c173.035,31.126) 173.171,30.99 171.288,29.107 ccw(c171.574,28.821) 171.825,28.504 171.829,28.504 173.743,30.418 cw(c173.879,30.282) 174.015,30.418 cw(c173.879,30.282) 174.015,30.146 ; 174.015,30.145 172.132,28.262 ccw(c172.418,27.976) 172.669,27.659 172.673,27.659 173.533,28.52 cw(c173.669,28.384) 173.806,28.519 174.271,28.054 180.6,21.725 182.2,20.125 182.233,20.125 182.719,20.125 cw(c182.719,19.933) 182.912,19.933 182.912,18.593 ccw(c183.316,18.593) 183.316,18.188 ccw(c183.316,18.593) 183.721,18.593 183.721,20.583 cw(c183.913,20.583) 183.913,20.775 cw(c183.913,20.583) 184.106,20.583 184.106,18.391 ccw(c184.51,18.391) 184.51,17.987 ccw(c184.51,18.391) 184.915,18.391 184.915,20.583 cw(c185.107,20.583) 185.107,20.775 cw(c185.107,20.583) 185.3,20.583 185.3,18.391 ccw(c185.704,18.391) 185.704,17.987 ccw(c185.704,18.391) 186.109,18.391 186.109,19.933 cw(c186.301,19.933) 186.301,20.125 186.45,20.125 191.35,20.125 195.725,15.75 197.713,13.762 197.713,9.363 197.309,8.958 197.309,7.841 197.472,7.678 197.472,7.403 v1(197.475,7.4)
BP_IO.LVDS_N4: J6.I4 R167.1 | length 106.4
  MidLayer2 w0.11: v1(196.228,11.575) 196.228,11.547 196.409,11.366 196.409,6.431 196.982,5.858 199.45,5.858 203.625,5.858 204.217,5.858 204.313,5.762 204.313,5.52 203.743,4.95 J6.I4@203.7,4.95
  BottomLayer w0.085: R167.1@163.15,33.45 163.397,33.697 163.397,33.794 163.447,33.844 164.756,33.844 172.553,26.047 172.658,25.942 ccw(c172.944,26.228) 173.23,25.942 173.922,26.634 cw(c174.058,26.498) 174.194,26.634 cw(c174.058,26.498) 174.194,26.362 ; 174.193,26.361 172.504,24.672 ccw(c172.79,24.386) 173.041,24.069 173.045,24.069 174.766,25.79 cw(c174.902,25.654) 175.038,25.79 cw(c174.902,25.654) 175.038,25.518 173.348,23.828 ccw(c173.634,23.542) 173.886,23.225 173.889,23.225 175.61,24.946 cw(c175.746,24.81) 175.882,24.946 cw(c175.746,24.81) 175.882,24.673 174.193,22.984 ccw(c174.479,22.698) 174.73,22.381 174.734,22.381 176.454,24.101 cw(c176.591,23.965) 176.727,24.101 cw(c176.591,23.965) 176.727,23.829 175.037,22.139 ccw(c175.323,21.853) 175.574,21.536 175.578,21.536 177.299,23.257 cw(c177.435,23.121) 177.571,23.257 cw(c177.435,23.121) 177.571,22.985 ; 177.57,22.984 175.881,21.295 ccw(c176.167,21.009) 176.418,20.692 176.422,20.692 178.143,22.413 cw(c178.279,22.277) 178.415,22.413 cw(c178.279,22.277) 178.415,22.141 ; 178.415,22.14 176.726,20.451 ccw(c177.012,20.165) 177.263,19.848 177.267,19.848 178.987,21.569 cw(c179.123,21.432) 179.26,21.569 cw(c179.123,21.432) 179.26,21.296 177.57,19.607 ccw(c177.856,19.321) 178.107,19.004 178.111,19.004 179.832,20.724 cw(c179.968,20.588) 180.104,20.724 cw(c179.968,20.588) 180.104,20.452 178.414,18.762 ccw(c178.7,18.476) 178.951,18.159 178.955,18.159 180.676,19.88 cw(c180.812,19.744) 180.948,19.88 cw(c180.812,19.744) 180.948,19.608 ; 180.679,17.921 181.156,17.444 181.525,17.075 192.122,17.075 196.422,12.775 196.422,12.193 196.422,11.774 196.228,11.58 v1(196.228,11.575) ; 180.679,17.921 ccw(c180.542,17.786) 180.406,17.922 180.003,17.518 cw(c179.717,17.804) 179.431,18.09 180.947,19.607
BP_IO.LVDS_N5: J6.K5 R168.1 | length 108.9
  BottomLayer w0.085: R168.1@163.15,31.45 163.397,31.697 163.397,31.794 163.447,31.844 163.819,31.844 163.975,31.844 164.002,31.817 ccw(c164.288,32.103) 164.574,31.817 164.834,32.077 cw(c164.97,31.941) 165.106,32.077 cw(c164.97,31.941) 165.106,31.805 162.71,29.409 ccw(c162.996,29.122) 162.71,28.836 ccw(c162.996,29.122) 163.247,28.805 163.251,28.805 165.678,31.233 cw(c165.814,31.097) 165.951,31.233 cw(c165.814,31.097) 165.951,30.96 ; 165.95,30.96 163.554,28.564 ccw(c163.84,28.278) 164.092,27.961 164.095,27.961 166.523,30.388 cw(c166.659,30.252) 166.795,30.388 cw(c166.659,30.252) 166.795,30.116 ; 166.794,30.116 166.535,29.856 ccw(c166.821,29.57) 166.535,29.284 166.811,29.008 166.885,28.934 167.097,28.722 167.202,28.617 ccw(c167.488,28.903) 167.774,28.617 168.399,29.242 cw(c168.535,29.106) 168.671,29.242 cw(c168.535,29.106) 168.671,28.97 ; 168.67,28.969 167.553,27.851 ccw(c167.839,27.565) 167.553,27.279 ccw(c167.839,27.565) 168.09,27.248 168.094,27.248 169.243,28.397 cw(c169.379,28.261) 169.515,28.397 cw(c169.379,28.261) 169.515,28.125 ; 169.515,28.125 168.397,27.007 ccw(c168.683,26.721) 168.934,26.404 168.938,26.404 170.087,27.553 cw(c170.224,27.417) 170.36,27.553 cw(c170.224,27.417) 170.36,27.281 ; 170.359,27.28 169.241,26.163 ccw(c169.527,25.877) 169.241,25.591 ccw(c169.527,25.877) 169.778,25.56 169.782,25.56 170.932,26.709 cw(c171.068,26.573) 171.204,26.709 cw(c171.068,26.573) 171.204,26.437 ; 171.203,26.436 170.579,25.812 ccw(c170.865,25.526) 170.579,25.24 171,24.819 171,24.4 171,23.325 174.875,19.45 178.875,15.45 179.075,15.45 179.224,15.45 ccw(c179.224,15.854) 179.628,15.854 179.628,16.388 cw(c179.821,16.388) 179.821,16.581 cw(c179.821,16.388) 180.013,16.388 180.013,15.111 ccw(c180.418,15.111) 180.418,14.707 ccw(c180.418,15.111) 180.822,15.111 180.822,16.388 cw(c181.015,16.388) 181.015,16.581 cw(c181.015,16.388) 181.207,16.388 181.207,15.111 ccw(c181.612,15.111) 181.612,14.707 ccw(c181.612,15.111) 182.016,15.111 182.016,16.388 cw(c182.209,16.388) 182.209,16.581 cw(c182.209,16.388) 182.401,16.388 182.401,15.111 ccw(c182.806,15.111) 182.806,14.707 ccw(c182.806,15.111) 183.21,15.111 183.21,16.388 cw(c183.403,16.388) 183.403,16.581 cw(c183.403,16.388) 183.595,16.388 183.595,15.111 ccw(c184,15.111) 184,14.707 ccw(c184,15.111) 184.404,15.111 184.404,16.388 cw(c184.597,16.388) 184.597,16.581 cw(c184.597,16.388) 184.789,16.388 184.789,15.111 ccw(c185.194,15.111) 185.194,14.707 ccw(c185.194,15.111) 185.598,15.111 185.598,16.388 cw(c185.79,16.388) 185.79,16.581 cw(c185.791,16.388) 185.983,16.388 185.983,15.111 ccw(c186.387,15.111) 186.387,14.707 ccw(c186.388,15.111) 186.792,15.111 186.792,15.258 cw(c186.984,15.258) 186.984,15.45 187.842,15.45 188.925,15.45 189.074,15.45 ccw(c189.074,15.854) 189.478,15.854 189.478,16.345 cw(c189.671,16.345) 189.671,16.537 cw(c189.671,16.345) 189.863,16.345 189.863,15.817 ccw(c190.268,15.817) 190.268,15.412 ccw(c190.268,15.817) 190.672,15.817 190.672,16.196 cw(c190.865,16.196) 190.865,16.388 cw(c190.865,16.196) 191.057,16.196 191.057,15.854 ccw(c191.462,15.854) 191.462,15.45 192.009,15.45 192.375,15.45 194.213,13.612 194.213,12.512 195.988,10.737 195.988,6.387 196.05,6.325 196.812,5.563 197.726,5.563 198.575,6.412 198.575,7.525 198.975,7.925 201.344,7.925 201.394,7.875 201.394,7.475 200.869,6.95 J6.K5@200.8,6.95
BP_IO.LVDS_N6: J6.H5 R169.1 | length 104.8
  MidLayer2 w0.11: v1(193,12.9) 193.028,12.9 193.209,13.082 196.818,13.082 197.838,12.062 197.838,8.477 198.477,7.838 205.318,7.838 205.581,7.575 205.581,7.375 205.157,6.95 J6.H5@205,6.95
  BottomLayer w0.085: R169.1@163.15,26.2 163.397,26.447 163.397,26.544 163.447,26.594 163.616,26.425 164.25,26.425 164.35,26.425 164.374,26.401 164.405,26.37 ccw(c164.691,26.656) 164.977,26.37 166.066,27.459 cw(c166.202,27.323) 166.338,27.459 cw(c166.202,27.323) 166.338,27.187 164.792,25.641 ccw(c165.078,25.355) 164.792,25.069 ccw(c165.078,25.355) 165.329,25.038 165.333,25.038 166.911,26.615 cw(c167.047,26.479) 167.183,26.615 cw(c167.047,26.479) 167.183,26.343 ; 167.182,26.342 165.637,24.796 ccw(c165.923,24.51) 166.174,24.193 166.178,24.193 167.755,25.771 cw(c167.891,25.634) 168.027,25.771 cw(c167.891,25.634) 168.027,25.498 ; 168.026,25.498 166.938,24.409 ccw(c167.224,24.123) 166.938,23.837 167.238,23.537 167.312,23.463 167.338,23.437 167.338,21.863 167.338,21.837 167.43,21.745 ccw(c167.716,22.031) 168.002,21.745 169.457,23.2 cw(c169.593,23.064) 169.729,23.2 cw(c169.593,23.064) 169.729,22.928 ; 169.729,22.927 167.81,21.008 ccw(c168.096,20.722) 167.81,20.436 ccw(c168.096,20.722) 168.347,20.405 168.351,20.405 170.301,22.356 cw(c170.437,22.219) 170.573,22.356 cw(c170.437,22.219) 170.573,22.083 ; 170.573,22.083 169.119,20.629 ccw(c169.405,20.343) 169.119,20.057 169.575,19.6 169.76,19.6 170.575,19.6 170.65,19.6 170.718,19.533 ccw(c171.004,19.819) 171.29,19.533 172.554,20.797 cw(c172.69,20.661) 172.826,20.797 cw(c172.69,20.661) 172.826,20.525 ; 172.826,20.524 170.955,18.653 ccw(c171.241,18.367) 170.955,18.081 ccw(c171.241,18.367) 171.492,18.05 171.496,18.05 173.398,19.953 cw(c173.534,19.817) 173.671,19.953 cw(c173.534,19.817) 173.671,19.68 ; 173.67,19.68 171.799,17.809 ccw(c172.085,17.523) 172.336,17.206 172.34,17.206 174.243,19.108 cw(c174.379,18.972) 174.515,19.108 cw(c174.379,18.972) 174.515,18.836 172.643,16.965 ccw(c172.929,16.679) 172.643,16.393 ccw(c172.929,16.679) 173.181,16.362 173.184,16.362 175.087,18.264 cw(c175.223,18.128) 175.359,18.264 cw(c175.223,18.128) 175.359,17.992 174.095,16.727 ccw(c174.381,16.441) 174.095,16.155 174.49,15.76 176.05,14.2 176.112,14.138 185.087,14.138 185.55,13.675 186.131,13.094 189.037,13.094 189.185,13.094 ccw(c189.185,13.498) 189.59,13.498 189.59,14.729 cw(c189.782,14.729) 189.782,14.922 cw(c189.782,14.729) 189.975,14.729 189.975,13.498 ccw(c190.379,13.498) 190.379,13.094 191.85,13.094 192.801,13.094 192.995,12.9 v1(193,12.9)
BP_IO.LVDS_N7: J6.F6 R170.1 | length 105.8
  SignalLayer1 w0.11: v1(195.598,9.806) 195.626,9.806 195.807,9.988 208.225,9.988 208.488,9.725 208.488,9.432 208.007,8.95 J6.F6@207.9,8.95 ; J6.F6@207.469,8.95 J6.F6@207.658,8.95
  BottomLayer w0.085: R170.1@163.15,24.2 163.397,24.447 163.397,24.613 163.447,24.663 163.937,24.663 165.725,22.875 165.725,18.35 165.863,18.213 165.968,18.107 ccw(c166.254,18.394) 166.54,18.107 167.887,19.455 cw(c168.023,19.319) 168.159,19.455 cw(c168.023,19.319) 168.159,19.183 ; 168.159,19.182 166.117,17.141 ccw(c166.403,16.855) 166.117,16.569 ccw(c166.403,16.855) 166.654,16.538 166.658,16.538 168.731,18.611 cw(c168.868,18.475) 169.004,18.611 cw(c168.868,18.475) 169.004,18.339 ; 169.003,18.338 166.961,16.296 ccw(c167.247,16.01) 167.499,15.693 167.502,15.693 169.576,17.767 cw(c169.712,17.63) 169.848,17.767 cw(c169.712,17.63) 169.848,17.494 ; 169.847,17.494 167.806,15.452 ccw(c168.092,15.166) 167.806,14.88 ccw(c168.092,15.166) 168.343,14.849 168.347,14.849 170.42,16.922 cw(c170.556,16.786) 170.692,16.922 cw(c170.556,16.786) 170.692,16.65 ; 170.692,16.649 168.65,14.608 ccw(c168.936,14.322) 168.65,14.036 ccw(c168.936,14.322) 169.187,14.005 169.191,14.005 171.264,16.078 cw(c171.4,15.942) 171.537,16.078 cw(c171.4,15.942) 171.537,15.806 ; 171.536,15.805 170.189,14.458 ccw(c170.475,14.172) 170.189,13.886 170.642,13.433 170.875,13.2 171.55,13.2 171.699,13.2 ccw(c171.699,13.604) 172.103,13.604 172.103,15.12 cw(c172.296,15.12) 172.296,15.313 cw(c172.296,15.12) 172.488,15.12 172.488,12.8 ccw(c172.893,12.8) 172.893,12.395 ccw(c172.893,12.8) 173.297,12.8 173.297,15.12 cw(c173.49,15.12) 173.49,15.313 cw(c173.49,15.12) 173.682,15.12 173.682,12.8 ccw(c174.087,12.8) 174.087,12.395 ccw(c174.087,12.8) 174.491,12.8 174.491,14.558 cw(c174.684,14.558) 174.684,14.751 cw(c174.684,14.558) 174.876,14.558 174.876,13.604 ccw(c175.281,13.604) 175.281,13.2 175.807,13.2 183.862,13.2 184.912,12.15 190.817,12.15 191.089,12.15 191.125,12.15 191.394,11.881 cw(c191.258,11.745) 191.394,11.609 190.831,11.046 ccw(c191.117,10.76) 191.403,10.474 192.561,11.631 cw(c192.697,11.495) 192.833,11.631 cw(c192.697,11.495) 192.833,11.359 ; 192.832,11.359 191.636,10.162 ccw(c191.922,9.876) 192.173,9.559 192.177,9.559 192.81,10.193 cw(c192.946,10.056) 193.082,10.193 193.114,10.161 193.188,10.088 193.2,10.075 193.275,10 195.399,10 195.593,9.806 v1(195.598,9.806)
BP_IO.LVDS_N8: J6.C6 R171.1 | length 129.2
  SignalLayer1 w0.11: v1(147.073,48.675) 147.101,48.675 147.282,48.857 147.56,48.857 150.154,51.45 166.49,51.45 168.73,49.21 170.975,46.965 170.975,46.669 v1(170.983,46.66)
  BottomLayer w0.085: R171.1@144.968,47.7 145.215,47.947 145.215,48.044 145.265,48.094 146.157,48.094 146.5,48.437 146.5,48.631 146.738,48.869 146.874,48.869 147.068,48.675 v1(147.073,48.675) ; v1(170.983,46.66) 170.987,46.657 171.261,46.657 171.427,46.491 171.697,46.221 172.172,45.747 172.246,45.673 172.276,45.642 ccw(c172.527,45.892) 172.778,45.642 173.327,46.191 cw(c173.429,46.091) 173.529,46.191 cw(c173.429,46.091) 173.529,45.99 172.21,44.671 172.21,44.667 ccw(c172.492,44.451) 172.241,44.201 ; 172.242,44.2 ccw(c172.492,44.451) 172.743,44.201 174.03,45.488 ; 172.944,43.499 cw(c173.195,43.749) 172.944,43.999 174.232,45.287 ccw(c174.131,45.388) 174.232,45.489 ccw(c174.131,45.388) 174.03,45.488 ; 172.945,43.497 ccw(c173.195,43.749) 173.41,43.467 173.415,43.467 174.733,44.786 cw(c174.834,44.685) 174.935,44.786 cw(c174.834,44.685) 174.935,44.584 ; 174.934,44.583 173.647,43.296 ccw(c173.898,43.046) 173.647,42.795 ccw(c173.898,43.046) 174.113,42.764 174.118,42.764 175.436,44.083 cw(c175.537,43.982) 175.638,44.083 cw(c175.537,43.982) 175.638,43.881 174.35,42.594 ccw(c174.601,42.343) 174.35,42.092 ccw(c174.601,42.343) 174.816,42.061 174.82,42.061 176.139,43.38 cw(c176.24,43.279) 176.341,43.38 cw(c176.24,43.279) 176.34,43.178 ; 176.34,43.178 175.053,41.891 ccw(c175.304,41.64) 175.053,41.389 ccw(c175.304,41.64) 175.519,41.358 175.523,41.358 176.842,42.677 cw(c176.943,42.576) 177.044,42.677 cw(c176.943,42.576) 177.043,42.475 ; 177.043,42.475 175.756,41.188 ccw(c176.006,40.937) 175.756,40.686 ccw(c176.006,40.937) 176.222,40.655 176.226,40.655 177.545,41.974 cw(c177.646,41.873) 177.746,41.974 cw(c177.646,41.873) 177.746,41.772 ; 177.746,41.772 176.459,40.485 ccw(c176.709,40.234) 176.459,39.984 ccw(c176.709,40.234) 176.925,39.953 176.929,39.953 178.248,41.271 cw(c178.349,41.171) 178.449,41.271 cw(c178.349,41.171) 178.449,41.07 ; 178.449,41.069 177.162,39.782 ccw(c177.412,39.531) 177.162,39.281 ccw(c177.412,39.531) 177.627,39.25 177.632,39.25 178.951,40.569 cw(c179.051,40.468) 179.152,40.569 cw(c179.051,40.468) 179.152,40.367 ; 179.151,40.366 177.864,39.079 ccw(c178.115,38.829) 177.864,38.578 ccw(c178.115,38.829) 178.33,38.547 178.335,38.547 179.571,39.783 cw(c179.671,39.682) 179.772,39.783 cw(c179.671,39.682) 179.772,39.581 179.305,39.114 ccw(c179.556,38.864) 179.306,38.612 179.598,38.321 179.672,38.247 189.443,28.475 196.125,28.475 196.75,27.85 ; 196.75,27.85 212.694,11.906 212.694,9.544 J6.C6@212.1,8.95